# Allegro board mib_fp_jtag_serial_18.brd
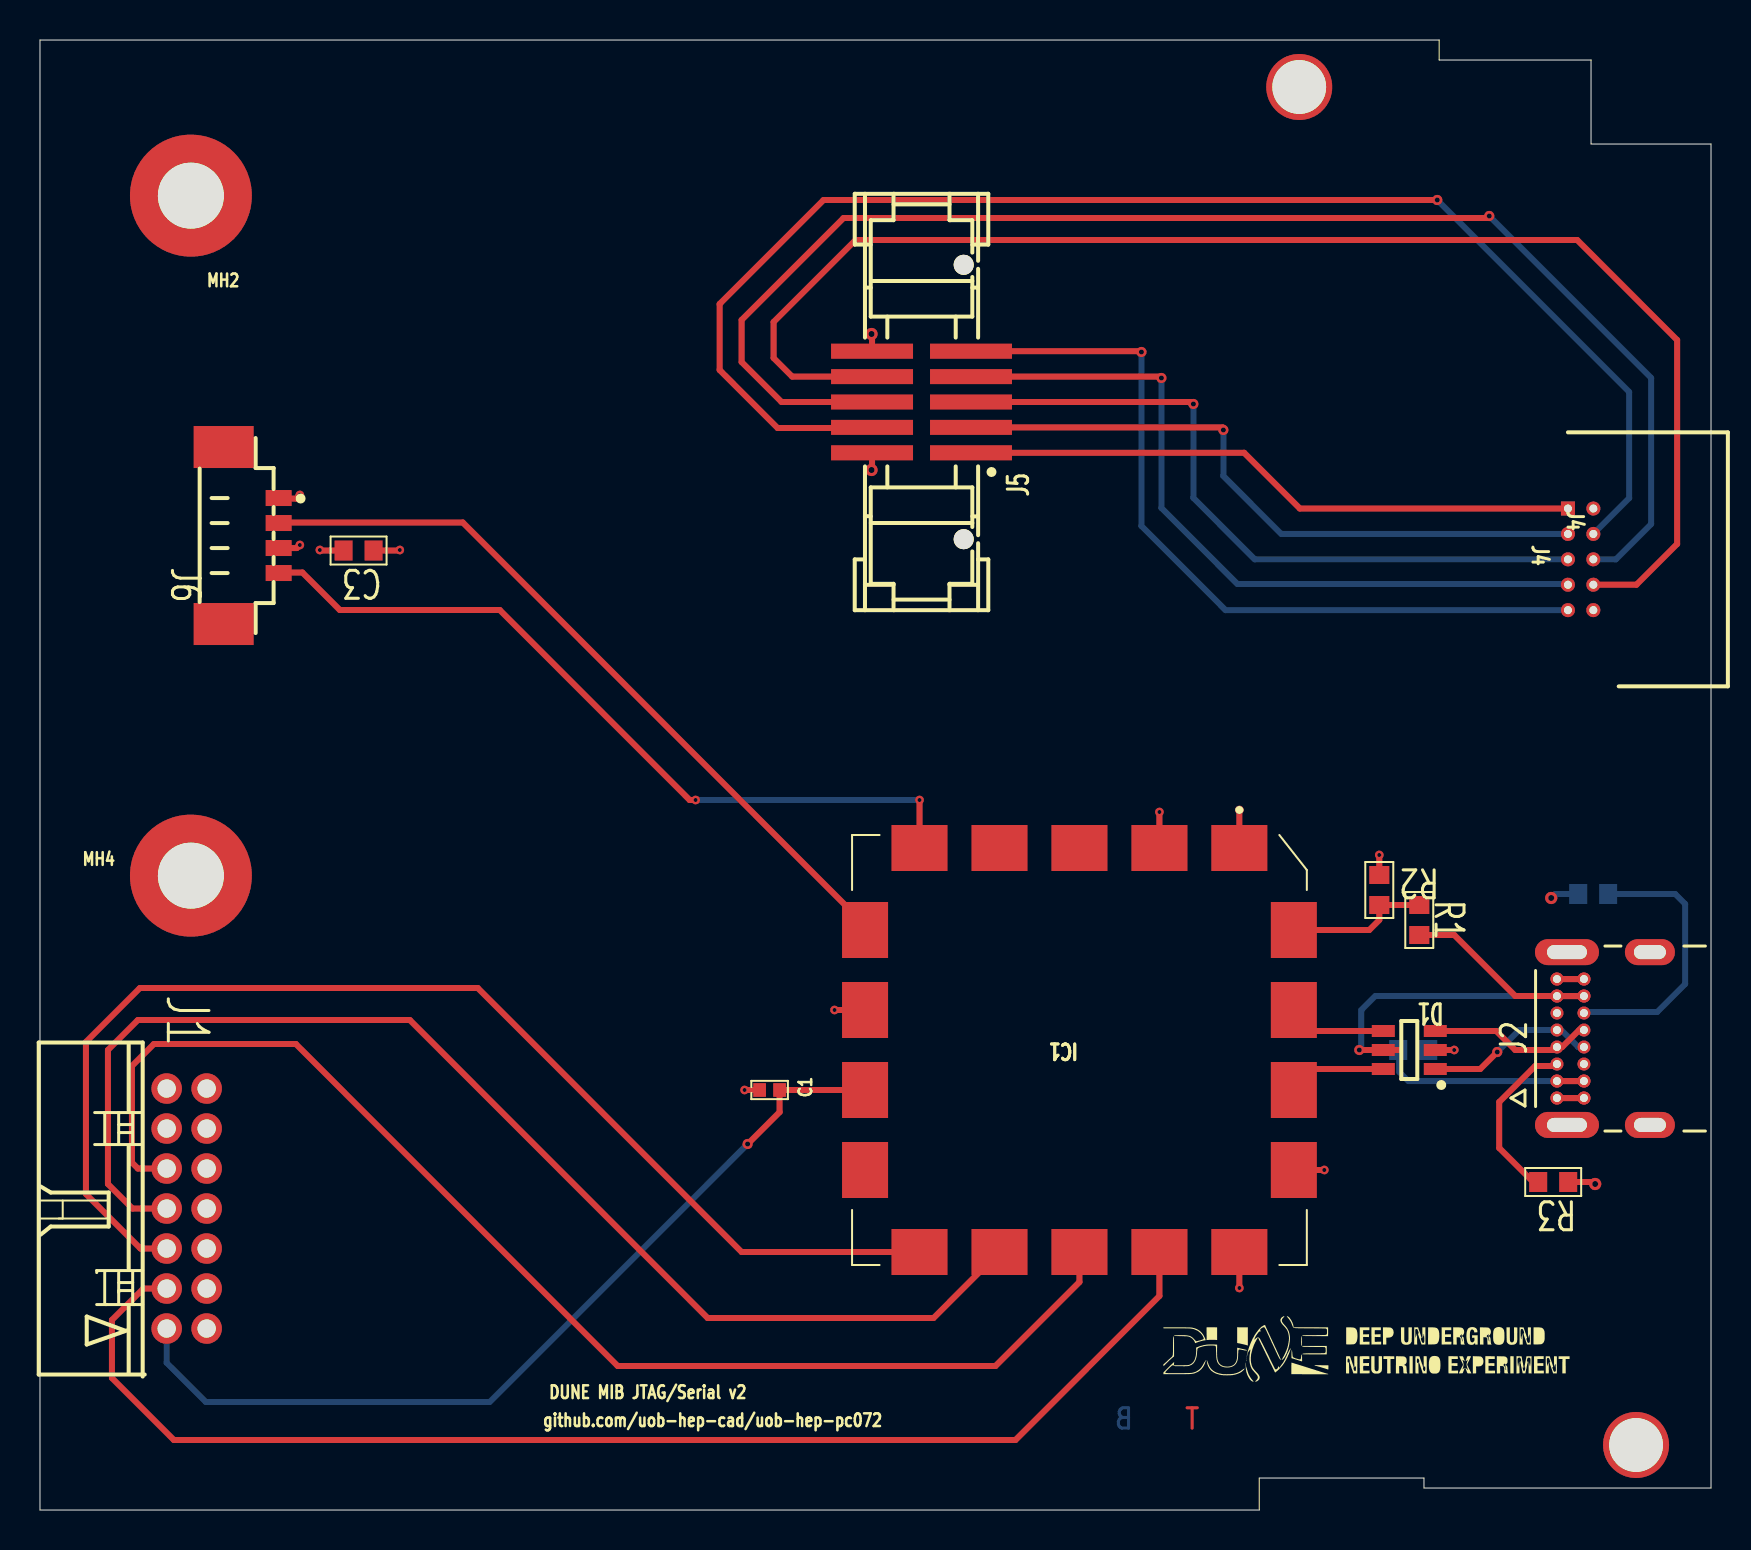
[diagram p0: board, top side]
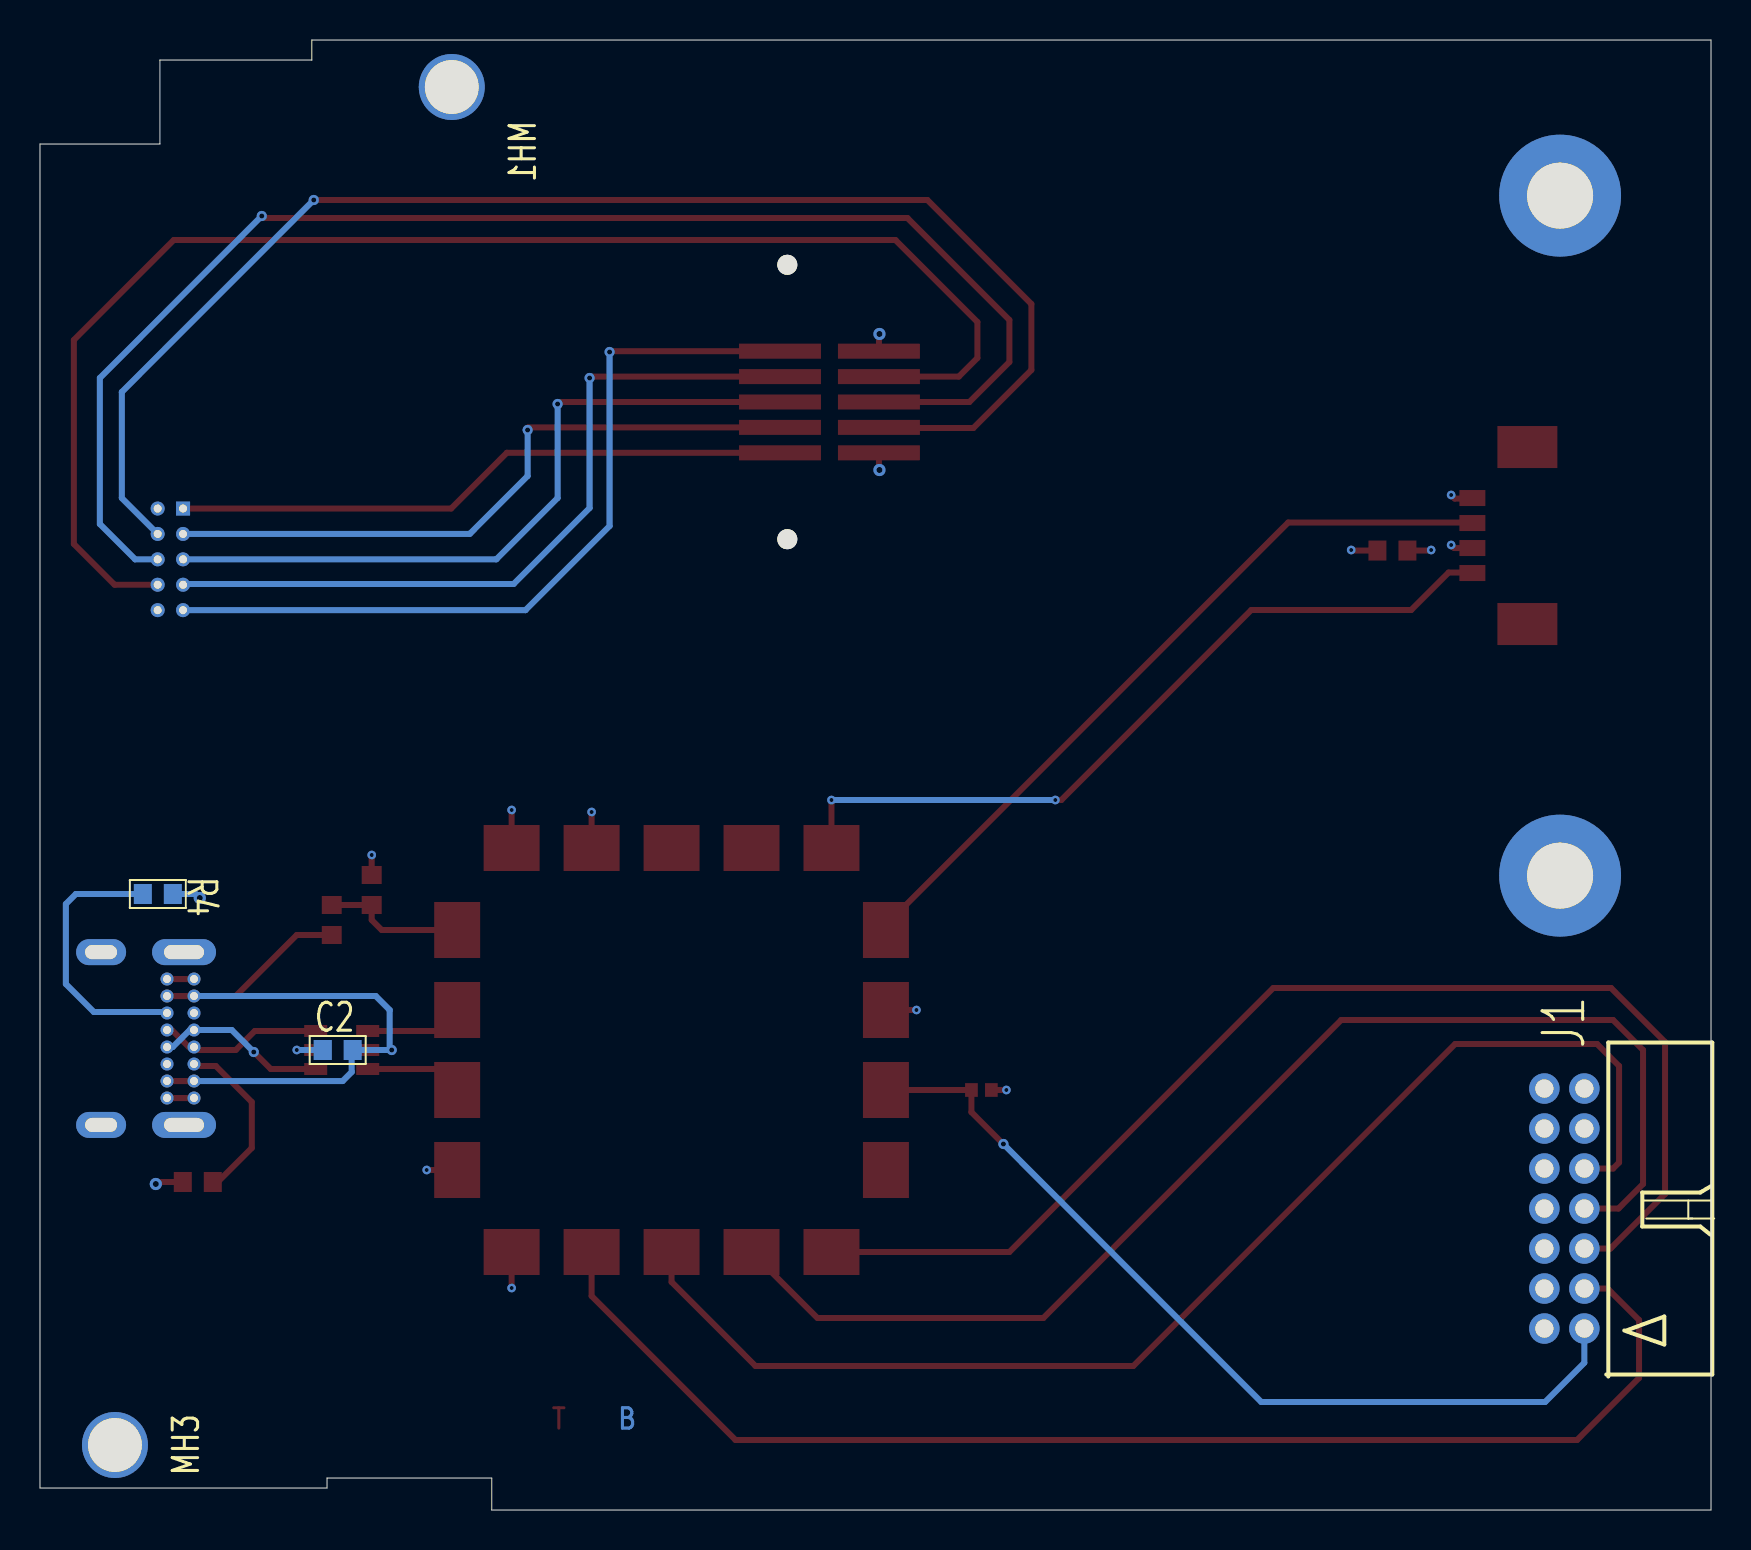
[diagram p1: board, bottom side, seen from below]

Outline 83.59 x 73.5 mm; copper layers: TOP, 02_GND, 03_VCC, BOTTOM. Coordinates in mm from the lower left corner of the outline.
Outline path: 0,73.5 70,73.5 70,72.5 77.59,72.5 77.59,68.3 83.59,68.3 83.59,1.1 69.24,1.1 69.24,1.6 61,1.6 61,0 0,0 0,73.5

## Design rules (mm)
constraint set DEFAULT: min track width 0.127

## Placement (name value [footprint] x y rotation side)
C1  0.1UF  [CAP0402]  36.5 21 180 top
C2  100nF  [C0603]  68.7 23 180 bottom
C3  100nF  [C0603]  15.94 47.97 180 top
D1  -  [SOT95P280X145-6N]  68.5 23 180 top
IC1  -  [410357B]  52 23 180 top
J1  -  [CONMOLEX14MC_2MM]  8.34 9.07 180 top
J2  -  [MOLEX_2137160001]  83.54 23.57 90 top
J4  -  [SHDRRA10W41P127_2X5_1270X546X533P]  76.44 50.07 270 top
J5  -  [SAMTEC_EHF-105-01-L-D-SM-LC]  44.1 55.4 90 top
J6  -  [MOLEX_53398-0471]  10.14 49.97 270 top
MH1  MT_HOLE  [MOUNTHOLE]  63 71.15 180 bottom
MH2  MT_HOLE  [MOUNTHOLE]  7.55 65.72 0 top
MH3  MT_HOLE  [MOUNTHOLE]  79.84 3.25 180 bottom
MH4  MT_HOLE  [MOUNTHOLE]  7.55 31.72 0 top
NOREF  -  []  81.31 68.3 90 top
NOREF#2  -  []  0 73.5 0 top
NOREF#3  -  []  61 0.73 0 top
NOREF#4  -  []  -97 0 0 top
NOREF#5  -  []  0 0 90 top
NOREF#6  -  []  56.2 6.4 0 top
NOREF#7  -  []  60.37 0 90 top
NOREF#8  -  []  70 73.04 0 top
R1  4.7k  [C0603]  69 29.5 270 top
R2  10k  [C0603]  67 31 270 top
R3  4.7k  [C0603]  75.7 16.4 180 top
R4  4.7k  [C0603]  77.7 30.8 0 bottom

## Library data of the parts
C1 = CAP_NP: Tolerance: TOL?; User Part Number: 445-7348-2-ND; part number: CAP_NP-445-7348-2-ND,CAP_NP; room: JTAG
C2 C3 = CAPCERSMDCL2: part number: CAPCERSMDCL2_0603-100NF,16V; tolerance: 10%
D1 = USBLC6-2: part number: USBLC6-2SC6
IC1 = 410_357_B: part number: 410_357_B-DIGILENT,410-357-B
J1 = CON14P: part number: CON14P-MOLEX_87833
J2 = CON16P_USB_C_USB2: part number: CON16P_USB_C_USB2-2137160001
J4 = SHF-105-01-L-D-RA: part number: SHF-105-01-L-D-RA-SHF-105-01-L-D-RA
J5 = CON10P: part number: CON10P-EHF-105-01-L-D-SM-LC
J6 = CON4P: part number: CON4P-53398-0471
MH1 MH2 = MT_HOLE: part number: MT_HOLE-MT_HOLE,MT_HOLE; room: TE0712
MH3 MH4 = MT_HOLE: part number: MT_HOLE-MT_HOLE,MT_HOLE
R1 R3 R4 = RSMD0603: part number: RSMD0603_1/10W-4.7K,1%; tolerance: 1%
R2 = RSMD0603: part number: RSMD0603_1/10W-10K,1%; tolerance: 1%

## Footprints (pads in the part's own frame, mm; a bottom-side part is the same pattern mirrored in y, then rotated)
410357B
  rect 2.8x2.3 smd: 1(-8,-10.1) 2(-4,-10.1) 3(0,-10.1) 4(4,-10.1) 5(8,-10.1) 10(8,10.1) 11(4,10.1) 12(0,10.1) 13(-4,10.1) 14(-8,10.1)
  rect 2.3x2.8 smd: 6(10.725,-6) 7(10.725,-2) 8(10.725,2) 9(10.725,6) 15(-10.725,6) 16(-10.725,2) 17(-10.725,-2) 18(-10.725,-6)
C0603
  rect 0.9x1 smd: 1(-0.75,0) 2(0.75,0)
CAP0402
  rect 0.635x0.686 smd: 1(-0.499,0) 2(0.499,0)
CONMOLEX14MC_2MM
  round 1.524 hole 0.914: 1(0,0) 2(2,0) 3(0,-2) 4(2,-2) 5(0,-4) 6(2,-4) 7(0,-6) 8(2,-6) 9(0,-8) 10(2,-8) 11(0,-10) 12(2,-10) 13(0,-12) 14(2,-12)
MOLEX_53398-0471
  rect 2.1x3 smd: (-3.175,-0.95) (5.675,-0.95)
  rect 0.8x1.3 smd: 1(-0.625,1.8) 2(0.625,1.8) 3(1.875,1.8) 4(3.125,1.8)
MOLEX_2137160001
  round 0.648 hole 0.4: A1(-2.975,7.65) A4(-2.125,7.65) A5(-1.275,7.65) A6(-0.425,7.65) A7(0.425,7.65) A8(1.275,7.65) A9(2.125,7.65) A12(2.975,7.65) B1(2.975,6.3) B4(2.125,6.3) B5(1.275,6.3) B6(0.425,6.3) B7(-0.425,6.3) B8(-1.275,6.3) B9(-2.125,6.3) B12(-2.975,6.3)
  oval 1.3x2.5 hole 0.7x1.6: SH1(-4.32,3) SH2(4.32,3)
  oval 1.3x3.2 hole 0.7x2: SH3(-4.32,7.15) SH4(4.32,7.15)
MOUNTHOLE
  round 6.096 hole 3.302: 1(0,0)
SAMTEC_EHF-105-01-L-D-SM-LC
  round 1 hole 1.2 unplated: (-6.86,-2.11) (6.86,-2.11)
  rect 0.75x4.1 smd: 1(-2.54,-2.475) 2(-2.54,2.475) 3(-1.27,-2.475) 4(-1.27,2.475) 5(0,-2.475) 6(0,2.475) 7(1.27,-2.475) 8(1.27,2.475) 9(2.54,-2.475) 10(2.54,2.475)
SHDRRA10W41P127_2X5_1270X546X533P
  rect 0.7x0.7 hole 0.4: 1(0,0)
  round 0.7 hole 0.4: 2(0,1.27) 3(1.27,0) 4(1.27,1.27) 5(2.54,0) 6(2.54,1.27) 7(3.81,0) 8(3.81,1.27) 9(5.08,0) 10(5.08,1.27)
SOT95P280X145-6N
  rect 1.15x0.6 smd: 1(-1.3,0.95) 2(-1.3,0) 3(-1.3,-0.95) 4(1.3,-0.95) 5(1.3,0) 6(1.3,0.95)

## Nets
GND: C1.2 C2.1 C3.1 D1.2 IC1.1 IC1.7 IC1.14 J1.1 J1.3 J1.5 J1.7 J1.9 J1.11 J2.A1 J2.A12 J2.B1 J2.B12 J2.SH1 J2.SH2 J2.SH3 J2.SH4 J4.2 J4.10(A<9>) J5.2 J5.10(A<9>) J6.1 MH1.1(MH_SIG) MH2.1(MH_SIG) MH3.1(MH_SIG) MH4.1(MH_SIG) R2.1 R3.1 R4.1
P5V: C2.2(B<0>) D1.5(VBUS) J2.A4 J2.A9 J2.B4 J2.B9(VBUS4) R1.2(B<0>)
VCC3V3: C3.2(B<0>) IC1.2 IC1.15 J6.3
MMC_RESET*: J4.6 J5.6
MMC_SPARE: J4.7 J5.7
MMC_TCK: J4.1 J5.1
MMC_TDI: J4.9 J5.9
MMC_TDO: J4.3 J5.3
MMC_TMS: J4.5 J5.5
MMC_TRST*: J4.8 J5.8
MP3V3: J4.4 J5.4
TCK: IC1.10 J1.6
TDI: IC1.12 J1.10(A<9>)
TDO: IC1.11 J1.8
TMS: IC1.13 J1.4
UART_RX_TO_FPGA_3V3: IC1.6 J6.2
UART_TX_FROM_FPGA_3V3: IC1.5 J6.4(A<3>)
UNNAMED_1_410357B_I128_VBUSDETE: IC1.18 R1.1 R2.2(B<0>)
UNNAMED_1_CON16PUSBCUSB2_I148_1: J2.B5 R4.2(B<0>)
UNNAMED_1_CON16PUSBCUSB2_I148_2: D1.3 J2.A6 J2.B6
UNNAMED_1_CON16PUSBCUSB2_I148_C: J2.A5 R3.2(B<0>)
UNNAMED_1_CON16PUSBCUSB2_I148_D: D1.1 J2.A7 J2.B7
USB_DM: D1.6 IC1.16
USB_DP: D1.4 IC1.17
VREF_JTAG: C1.1 IC1.8(VREF_JTAG) J1.2

Pads without a net: IC1 3 4 9; J1 12 13 14; J2 A8 B8

## Via types
v1: diameter 0.508, hole 0.254, TOP to BOTTOM, 9 vias
v2: diameter 0.432, hole 0.203, TOP to BOTTOM, 14 vias
v3: diameter 0.61, hole 0.305, TOP to BOTTOM, 4 vias

## Routing (per net, layer and track width the routed paths; a pad name or vN(x,y) marks a point on that pad's centre or on a via; arc(x,y) is an arc through that point)
GND: length 19
  TOP w0.3: J2.A1 J2.B12 ; v2(35.25,21) C1.2 ; v2(67,32.75) R2.1 ; J5.10 41.62,58.77 v3(41.6,58.8) ; v2(39.75,25) IC1.7 ; J6.1 11.97,50.57 12.82,50.57 v2(13,50.75) ; C3.1 17.97,47.97 v2(18,48) ; R3.1 77.7,16.4 v3(77.8,16.3) ; v3(41.6,52) 41.62,52.02 J5.2 ; v2(60,11.1) IC1.14 ; v2(70.75,23) D1.2 ; v2(60,35) IC1.1 ; J2.A12 J2.B1
  BOTTOM w0.3: C2.1 v2(70.75,23) ; v3(75.6,30.6) 75.8,30.8 R4.1
P5V: length 36.1
  TOP w0.3: 68,23 D1.5 v1(66,23) ; J2.B4 J2.A9 75.89,25.7 73.8,25.7 70.75,28.75 R1.2 ; J2.A4 J2.B9
  BOTTOM w0.3: J2.A9 75.89,25.7 66.8,25.7 66.1,25 66.1,23.1 v1(66,23) C2.2 68,22.95 68,21.9 68.45,21.45 J2.A4
VCC3V3: length 5.6
  TOP w0.3: v2(56,34.9) IC1.2 ; v2(64.25,17) IC1.15 ; C3.2 14.03,47.97 v2(14,48) ; J6.3 12.85,48.1 v2(13,48.25)
MMC_RESET*: length 71.4
  TOP w0.3: v1(72.5,64.7) 72.4,64.6 40.2,64.6 35.1,59.5 35.1,57.4 37.1,55.4 J5.6
  BOTTOM w0.3: J4.6 78.83,47.53 80.6,49.3 80.6,56.6 v1(72.5,64.7)
MMC_SPARE: length 38
  TOP w0.3: J5.7 56.03,56.67 v1(56.1,56.6)
  BOTTOM w0.3: J4.7 76.4,46.3 59.9,46.3 56.1,50.1 v1(56.1,56.6)
MMC_TCK: length 31
  TOP w0.3: J5.1 60.24,52.86 63.03,50.07 J4.1
MMC_TDI: length 40.3
  TOP w0.3: v1(55.1,57.9) 55.06,57.94 J5.9
  BOTTOM w0.3: v1(55.1,57.9) 55.1,49.2 59.31,44.99 J4.9
MMC_TDO: length 33.5
  TOP w0.3: v1(59.2,54) 59.2,54.1 59.17,54.13 J5.3
  BOTTOM w0.3: J4.3 62.1,48.8 59.2,51.7 v1(59.2,54)
MMC_TMS: length 35.9
  TOP w0.3: v1(57.7,55.3) 57.6,55.4 J5.5
  BOTTOM w0.3: v1(57.7,55.3) 57.7,50.6 60.77,47.53 J4.5
MMC_TRST*: length 71.3
  TOP w0.3: J4.8 79.86,46.26 81.9,48.3 81.9,58.5 76.9,63.5 40.8,63.5 36.7,59.4 36.7,57.6 37.63,56.67 J5.8
MP3V3: length 71.6
  TOP w0.3: J5.4 41.59,54.1 36.9,54.1 34,57 34,60.3 39.2,65.5 v1(69.9,65.5)
  BOTTOM w0.3: J4.4 79.5,50.6 79.5,55.9 v1(69.9,65.5)
TCK: length 61.1
  TOP w0.3: IC1.10 35.1,12.9 21.9,26.1 5,26.1 2.3,23.4 2.3,15.8 5.03,13.07 J1.6
TDI: length 64.5
  TOP w0.3: IC1.12 52,11.4 47.8,7.2 28.9,7.2 12.8,23.3 5.7,23.3 4.6,22.2 4.6,17.37 4.9,17.07 J1.10
TDO: length 62.9
  TOP w0.3: IC1.11 44.7,9.6 33.4,9.6 18.5,24.5 4.9,24.5 3.4,23 3.4,16.3 4.63,15.07 J1.8
TMS: length 65.2
  TOP w0.3: J1.4 5.17,11.07 3.6,9.5 3.6,6.6 6.7,3.5 48.8,3.5 56,10.7 IC1.13
UART_RX_TO_FPGA_3V3: length 37.9
  TOP w0.3: IC1.6 41.28,29.25 21.15,49.38 11.96,49.38 J6.2
UART_TX_FROM_FPGA_3V3: length 39.2
  TOP w0.3: J6.4 11.96,46.88 13.12,46.88 15,45 23,45 32.5,35.5 v2(32.8,35.5) ; IC1.5 v2(44,35.5)
  BOTTOM w0.3: v2(32.8,35.5) v2(44,35.5)
UNNAMED_1_410357B_I128_VBUSDETE: length 7.2
  TOP w0.3: R1.1 R2.2 67,29.5 66.5,29 IC1.18
UNNAMED_1_CON16PUSBCUSB2_I148_1: length 13.7
  BOTTOM w0.3: J2.B5 77.29,24.9 80.9,24.9 82.3,26.3 82.3,30.3 81.8,30.8 R4.2
UNNAMED_1_CON16PUSBCUSB2_I148_2: length 8.2
  TOP w0.3: D1.3 72.85,23.95 73.8,23 75.74,23 J2.A6 76.15,23.15 77,24 J2.B6
UNNAMED_1_CON16PUSBCUSB2_I148_C: length 8.6
  TOP w0.3: R3.2 74.7,16.4 73,18.1 73,20.4 74.8,22.2 75.79,22.2 J2.A5
UNNAMED_1_CON16PUSBCUSB2_I148_D: length 8.6
  TOP w0.3: D1.1 72.05,22.05 v1(72.9,22.9)
  BOTTOM w0.3: J2.B7 76.95,23.15 76.1,24 J2.A7 75.89,24 74,24 v1(72.9,22.9)
USB_DM: length 5.1
  TOP w0.3: D1.6 63.53,22.05 62.72,21.25 IC1.16
USB_DP: length 4.9
  TOP w0.3: IC1.17 63.78,23.95 D1.4
VREF_JTAG: length 44.6
  TOP w0.3: IC1.8 C1.1 37,19.89 35.41,18.3 v1(35.4,18.3)
  BOTTOM w0.3: v1(35.4,18.3) 22.5,5.4 8.3,5.4 6.34,7.36 J1.2

## Copper pours and planes (outline as drawn; the poured copper is in the pictures)
GND on 02_GND: 60.36,0.64 0.5,0.64 0.5,72.86 69.36,72.86 69.36,71.86 76.96,71.86 76.96,67.67 82.96,67.67 82.96,1.74 69.87,1.74 69.87,2.23 60.36,2.23 ; 1 cut-out
VCC3V3 on 03_VCC: 60.36,0.64 0.5,0.64 0.5,72.86 69.36,72.86 69.36,71.86 76.96,71.86 76.96,67.67 82.96,67.67 82.96,1.74 69.87,1.74 69.87,2.23 60.36,2.23 ; 1 cut-out

Small or netless copper shapes (teardrops, artwork), in the pictures only: 4 on TOP

## Text on the board
BOTTOM: B
TOP: T
Ref Des/Silkscreen Top: github.com/uob-hep-cad/uob-hep-pc072 | DUNE MIB JTAG/Serial v2
02_GND: 2
03_VCC: 3
User.45: FIGURE | FINISHED_SIZE | 0.2032 | 0.254 | 0.85 | 0.9144 | 0.95 | 1.05 | 2.4 | 2.692 | 3.302 | 0.9906 | 1.55 | DRILL CHART: TOP to BOTTOM | ALL UNITS ARE IN MILLIMETERS | TOLERANCE_DRILL | +0.0/-0.2029 | +0.0/-0.254 | +0.0/-0.0 | PLATED | NON-PLATED | QTY | 55 | 7 | 1 | 4 | 9 | 10 | 2 | MICRO-TCA INTERFACE BOARD (MIB) front panel ethernet DB | 1. BOARD THICKNESS: 1.57mm | 2. MATERIAL: FR4 (RoHS COMPLIANT MATERIAL) OR EQUIVALENT. GLASS | 3. ALL HOLES ARE PLATED THROUGH UNLESS OTHERWISE NOTED | 5. ALL TOLERANCES +/-3MILS EXCEPT WHERE NOTED
